# Altium PCB NEXUS32.PcbDoc (part 3 of 3)
Units mil, origin at the board's own origin, x right, y up, seen from the top; angles counter-clockwise.
Board outline 6299 x 4724 mil, 4 copper layers (Top Layer, L2_GND, L3_PWR, Bottom Layer), stack 63.6 mil thick; 220 components, 128 nets, 690 pads, 369 vias.
Unrouted connection lines stored in the file: 1.
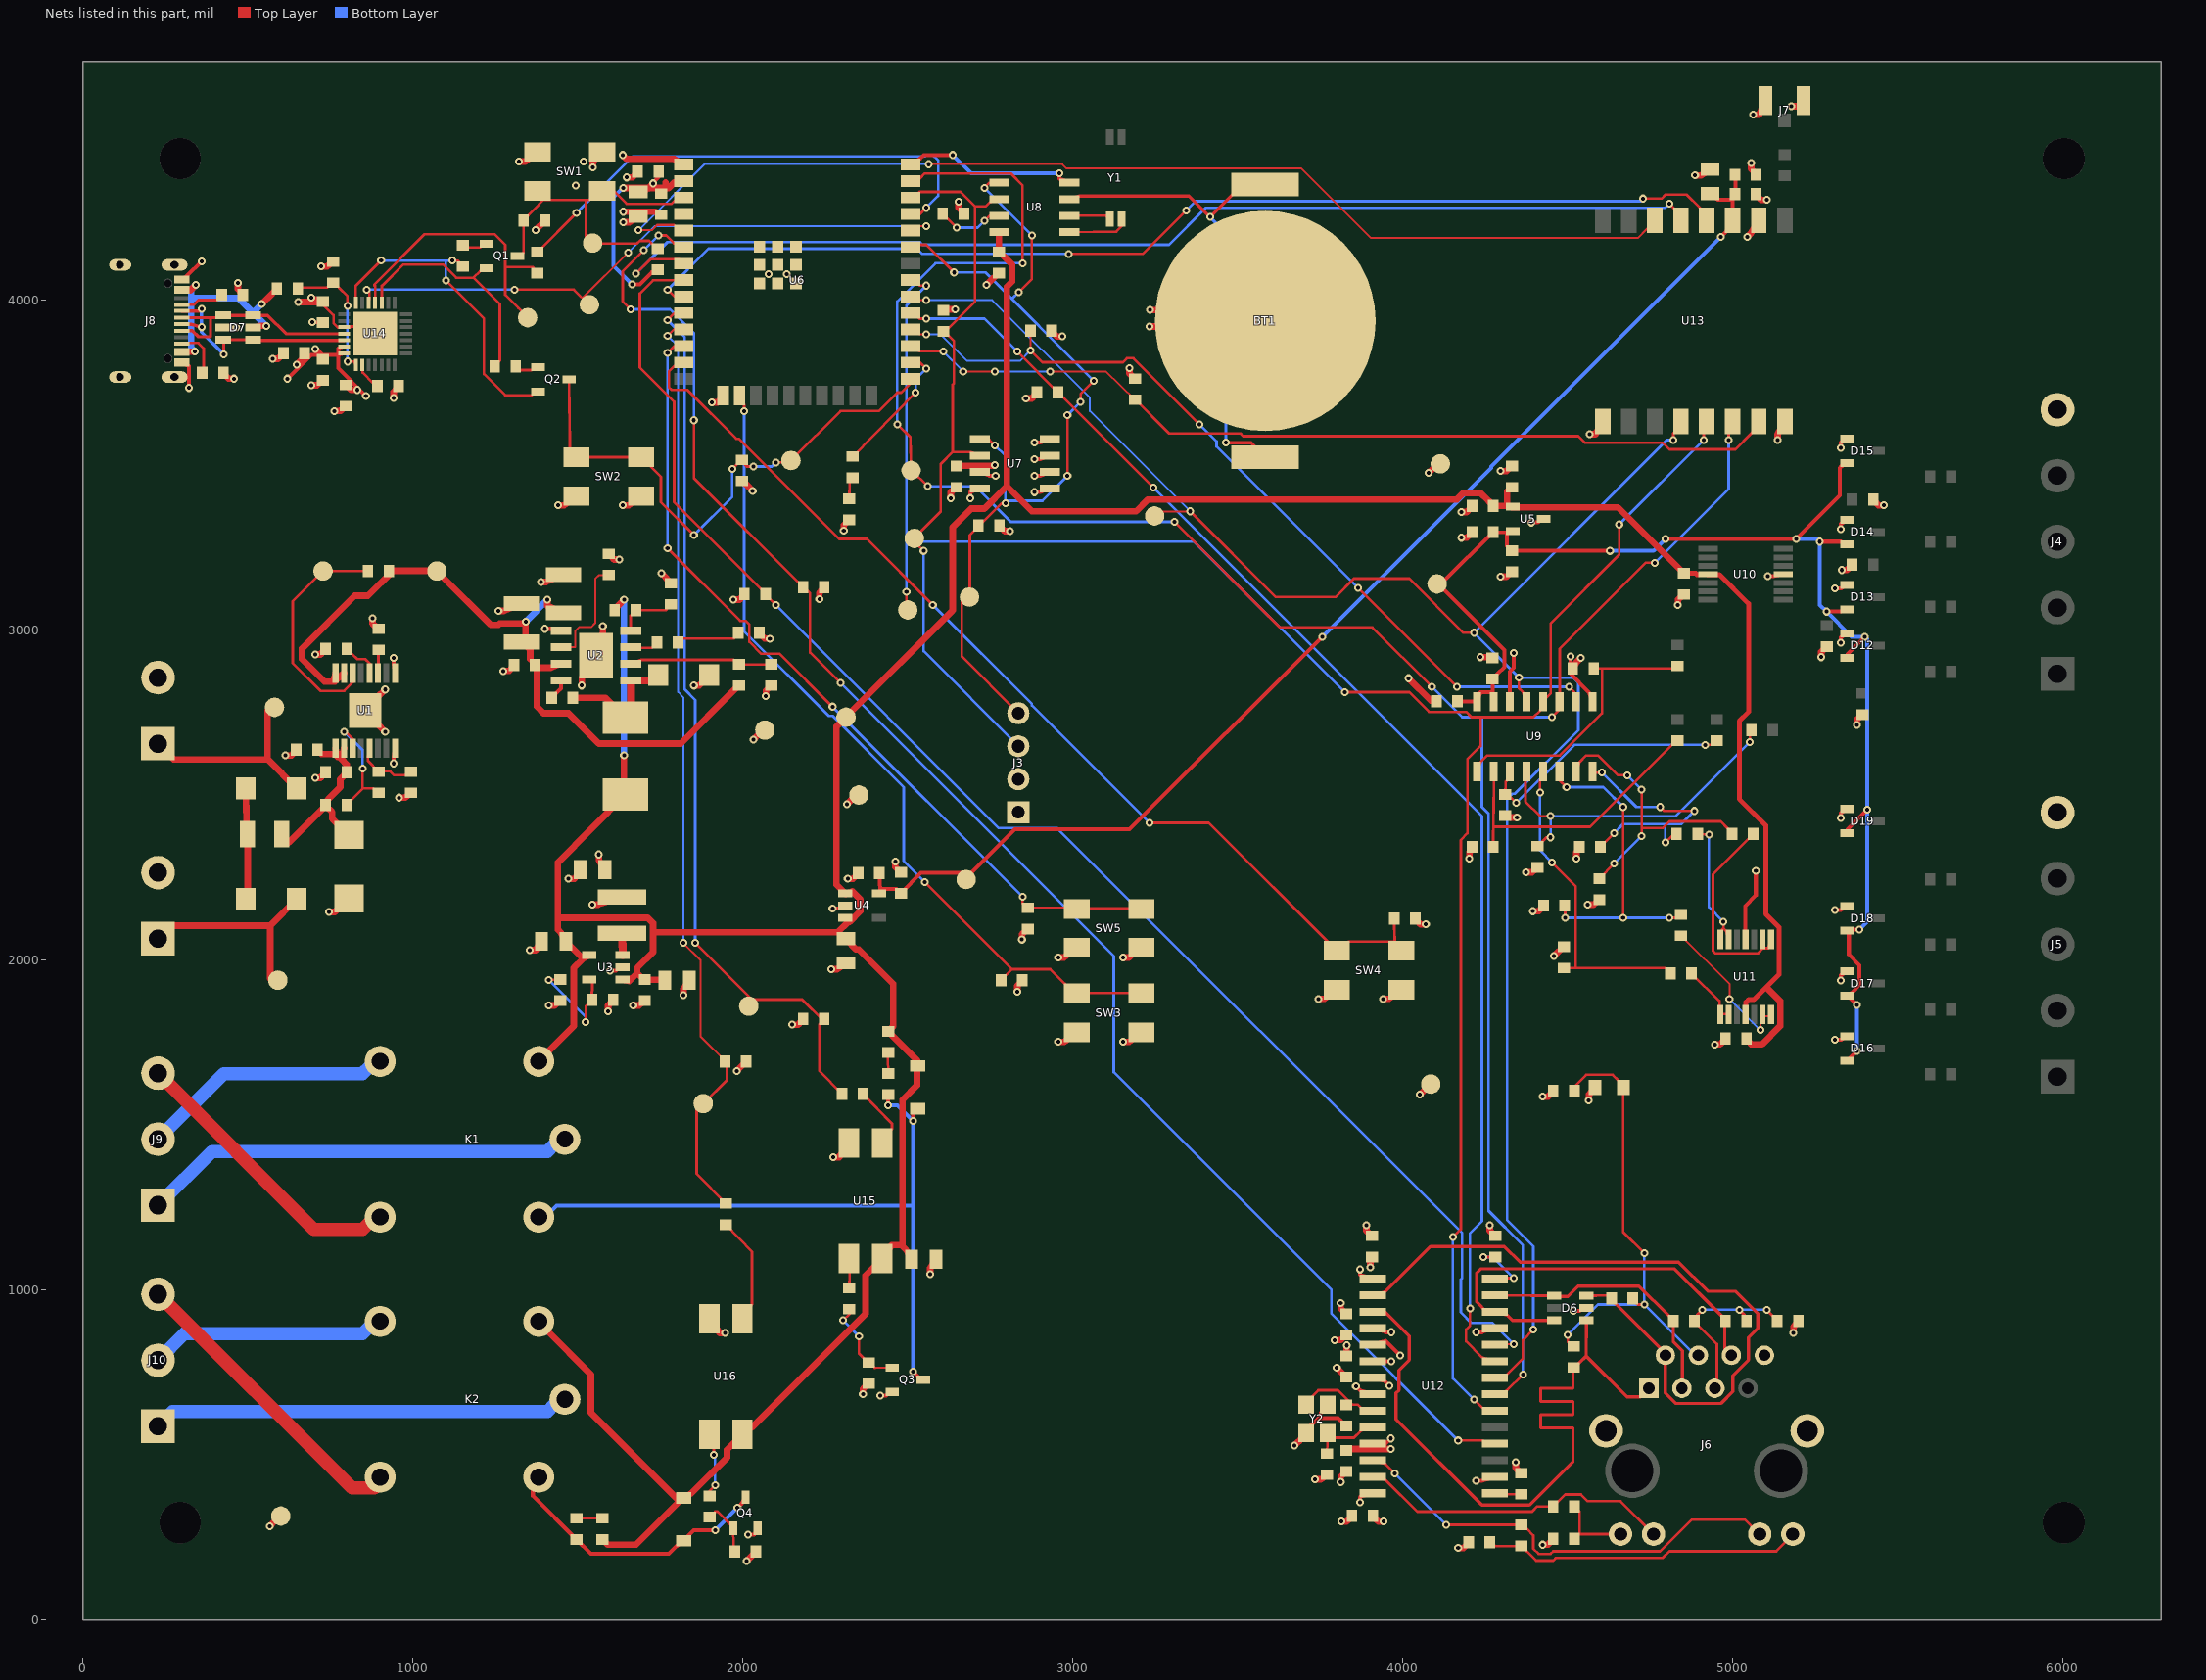
[diagram p4: the nets of this part, all layers, seen from the top]

## Via types
v1: diameter 24, hole 12, Top Layer to Bottom Layer, tented both sides, 369 vias

## Nets (pads, with @x,y where several pads share a name; then routed paths per layer and width w, separated by ;. In a path a pad name is that pad's centre, name@x,y a point inside that pad or via, vN(x,y) a via of type N, cw(c..) or ccw(c..) an arc to the next point about the centre after c; other vN are vias at no path point) (continued)
AOUT4: R38.1 U11.1 U11.2 | length 183.9
  Top Layer w8: R38.1@4875,1959 4960,1876 4960,1864 U11.1@4962,1835 ; U11.1@4964,1836 4980,1836 U11.2@4988,1835
AOUT5: R40.1 U11.6 U11.7 | length 461.2
  Top Layer w6: R40.1@4843,2074 4990,1928 v1(4990,1882) ; v1(5084,1788) 5084,1806 U11.6@5090,1835 ; U11.6@5090,1830 5108,1830 U11.7@5116,1835
  Bottom Layer w6: v1(4990,1882) v1(5084,1788)
AOUT6: R42.1 U11.8 U11.9 | length 637.7
  Top Layer w8: R42.1@5062,2382 4940,2260 4940,2028 4948,2020 5076,2020 U11.9@5092,2036 ; U11.9@5090,2063 U11.9@5092,2036 ; U11.8@5116,2063 5108,2036 U11.9@5092,2036
AOUT7: R44.1 U11.13 U11.14 | length 409.1
  Top Layer w8: R44.1@4894,2382 v1(4928,2380) ; U11.14@4962,2063 4968,2092 4972,2096 ; v1(4972,2116) 4972,2096 ; U11.13@4988,2063 4980,2088 4972,2096
  Bottom Layer w8: v1(4928,2380) 4928,2160 v1(4972,2116)
BST_N: C7.1 U2.8 | length 64.6
  Top Layer w12: C7.1@1421,2795 1449,2823 U2.8@1449,2848
BTN_DOWN: C27.1 SW4.1 U6.13 | length 3125.5
  Top Layer w8: U6.13@1821,3811 1792,3800 1776,3784 1776,3736 1784,3728 1832,3728 1980,3580 1988,3580 2292,3276 2376,3276 v1(2576,3076) ; v1(3232,2416) 3412,2416 SW4.1@3800,2028 3836,2056 SW4.1@3976,2056 ; C27.1@3974,2126 SW4.1@3976,2056 ; SW4.1@3996,2028 SW4.1@3976,2056
  Bottom Layer w8: v1(2576,3076) 2876,2776 2876,2772 v1(3232,2416)
BTN_OK: C28.1 SW5.1 U6.12 | length 2578.8
  Top Layer w8: v1(1772,3248) 1992,3028 2008,3028 2020,3016 2020,2964 2056,2928 2112,2928 v1(2272,2768) ; v1(1772,3840) 1792,3860 U6.12@1821,3861 ; v1(2848,2192) 2848,2172 C28.1@2864,2158 2976,2160 SW5.1@3012,2155 ; SW5.1@3012,2156 3172,2156 SW5.1@3208,2155
  Bottom Layer w8: v1(1772,3248) v1(1772,3840) ; v1(2272,2768) v1(2848,2192)
BTN_UP: C26.1 SW3.1 U6.16 | length 2552.9
  Top Layer w8: U6.16@1990,3711 2004,3684 v1(2004,3664) ; v1(2552,2236) 2816,1972 ; C26.1@2783,1939 2816,1972 ; SW3.1@3012,1899 2976,1928 2932,1972 2816,1972 ; SW3.1@3012,1900 3172,1900 SW3.1@3208,1899
  Bottom Layer w8: v1(2004,3664) 2004,2996 2260,2740 2272,2740 2488,2524 2488,2300 v1(2552,2236)
CC1: J8.A5 R59.1 | length 133.7
  Top Layer w8: J8.A5@300,3986 336,3986 350,4000 406,4000 R59.1@421,4016
CC2: J8.B5 R60.1 | length 147.9
  Top Layer w8: J8.B5@300,3868 302,3870 350,3870 366,3854 366,3798 R60.1@362,3780
CH0: C33.1 R26.2 U9.1 | length 851.7
  Top Layer w8: U9.1@4225,2571 4236,2600 4256,2620 4476,2620 4604,2748 4604,2884 ; C33.1@4579,2884 4816,2884 R26.2@4833,2891
CH1: C34.1 R29.2 U9.2 | length 892.2
  Top Layer w8: C34.1@4274,2343 4276,2544 U9.2@4275,2571 ; 4276,2404 4568,2404 4816,2652 R29.2@4833,2665
CH2: C35.1 R32.2 U9.3 | length 802.1
  Top Layer w8: C35.1@4311,2502 4312,2540 4316,2544 U9.3@4325,2571 ; C35.1@4312,2508 v1(4344,2476) ; v1(4916,2652) 4936,2652 R32.2@4951,2665
  Bottom Layer w8: v1(4344,2476) 4520,2652 v1(4916,2652)
CH3: C36.1 R35.2 U9.4 | length 1034.1
  Top Layer w8: U9.4@4375,2571 4372,2544 4372,2480 4416,2436 v1(4448,2436) ; C36.1@4409,2345 4436,2372 v1(4448,2372) ; v1(5052,2660) 5052,2680 R35.2@5057,2697
  Bottom Layer w8: v1(4448,2372) v1(4448,2436) 4828,2436 v1(5052,2660)
CH4: C37.1 R38.2 U9.5 | length 971.9
  Top Layer w8: v1(4416,2508) 4416,2544 U9.5@4425,2571 ; v1(4452,2296) 4524,2224 4524,1976 ; C37.1@4488,1976 4796,1976 R38.2@4811,1959
  Bottom Layer w8: v1(4416,2508) 4416,2332 v1(4452,2296)
CH5: C38.1 R40.2 U9.6 | length 979.2
  Top Layer w8: U9.6@4475,2571 4476,2544 v1(4496,2524) ; C38.1@4491,2165 v1(4492,2128) ; v1(4668,2128) v1(4668,2464) ; v1(4808,2128) 4828,2128 R40.2@4843,2138
  Bottom Layer w8: v1(4492,2128) v1(4808,2128) ; v1(4496,2524) 4608,2524 v1(4668,2464)
CH6: C39.1 R42.2 U9.7 | length 891.5
  Top Layer w8: U9.7@4525,2571 4536,2600 4556,2620 4592,2620 4652,2560 v1(4680,2560) ; C39.1@4596,2247 v1(4640,2292) ; v1(4724,2376) v1(4724,2516) ; 4724,2400 4788,2400 4808,2420 4964,2420 4984,2400 R42.2@4998,2382
  Bottom Layer w8: v1(4640,2292) v1(4724,2376) ; v1(4680,2560) v1(4724,2516)
CH7: C40.1 R44.2 U9.8 | length 787.2
  Top Layer w8: U9.8@4575,2571 4584,2568 v1(4604,2568) ; C40.1@4599,2343 v1(4640,2384) ; v1(4780,2464) 4792,2452 v1(4884,2452) ; v1(4796,2356) 4816,2376 R44.2@4830,2382
  Bottom Layer w8: v1(4604,2568) 4708,2464 v1(4780,2464) ; v1(4640,2384) 4668,2412 4844,2412 v1(4884,2452) ; v1(4796,2356) 4796,2412
COIL1: D8.1 D10.2 K1.2 Q3.3 | length 2114.8
  Top Layer w12: v1(2440,1560) D10.2@2441,1592 ; v1(2516,752) 2528,740 Q3.3@2547,728 ; v1(2516,1512) 2516,1532 D8.1@2530,1549
  Bottom Layer w12: K1.2@1382,1221 1416,1236 1436,1256 2516,1256 ; v1(2440,1560) 2468,1560 v1(2516,1512) v1(2516,752)
COIL2: D9.1 D11.2 K2.2 Q4.3 | length 852.5
  Top Layer w12: K2.2@1382,433 1364,400 1364,376 D11.2@1496,244 1540,200 1776,200 1800,224 D9.1@1821,240 ; D9.1@1820,240 1852,272 v1(1916,272) ; v1(1984,340) 1996,352 Q4.3@2008,372
  Bottom Layer w12: v1(1916,272) v1(1984,340)
COMP_N: R9.1 U2.3 | length 86.4
  Top Layer w8: U2.3@1661,2948 1692,2946 1724,2946 R9.1@1740,2963
COMP_RC: C8.1 R9.2 | length 194.6
  Top Layer w8: R9.2@1804,2963 1818,2974 1972,2974 C8.1@1986,2992
CS_ADC: R20.2 U6.28 U9.10 | length 2598.1
  Top Layer w6: U6.28@2509,3911 2536,3896 v1(2556,3896) ; v1(2872,3848) R20.2@2872,3907
  Top Layer w8: v1(2872,3848) 2908,3812 3152,3812 3164,3824 3184,3824 v1(3384,3624) ; v1(3864,3128) v1(4164,2828) ; v1(4504,2828) 4520,2812 U9.10@4525,2783
  Bottom Layer w6: v1(2556,3896) 2600,3896 2680,3816 2840,3816 v1(2872,3848)
  Bottom Layer w8: v1(3384,3624) 3436,3572 3436,3556 v1(3864,3128) ; v1(4164,2828) v1(4504,2828)
CS_ENC: R19.2 U6.29 U12.9 | length 4080.4
  Top Layer w8: U6.29@2509,3961 2536,3944 v1(2556,3944) ; v1(2832,3844) R19.2@2955,3720 ; R19.2@2956,3720 v1(3244,3432) ; v1(4204,944) 4204,892 4192,880 4192,844 4240,796 U12.9@4279,784
  Bottom Layer w8: v1(2556,3944) 2732,3944 v1(2832,3844) ; v1(3244,3432) 4240,2436 4240,1208 4204,1172 v1(4204,944)
CS_LORA: R21.2 U6.27 U13.15 | length 2738.1
  Top Layer w6: U6.27@2509,3861 2536,3844 v1(2608,3844) ; v1(2668,3784) v1(2764,3784) ; v1(2932,3784) 3100,3784 R21.2@3189,3698
  Top Layer w8: R21.2@3188,3700 3292,3596 3508,3596 3516,3588 4532,3588 4552,3568 4788,3568 4808,3548 5008,3548 5056,3596 U13.15@5079,3632
  Bottom Layer w6: v1(2608,3844) v1(2668,3784) ; v1(2764,3784) v1(2932,3784)
DIO0: U6.7 U13.5 | length 3456.4
  Top Layer w8: v1(1676,4080) 1720,4124 1808,4124 U6.7@1821,4111 ; v1(4808,4292) 4820,4280 U13.5@4843,4242
  Bottom Layer w8: v1(1676,4080) 1772,4176 2536,4176 2544,4168 3292,4168 3404,4280 4796,4280 v1(4808,4292)
DIO1: U6.5 U13.6 | length 3426.8
  Top Layer w6: v1(1684,4212) 1724,4212 1740,4228 1792,4228 U6.5@1821,4211 ; v1(2564,4412) 2968,4412 2980,4400 3692,4400 3904,4188 4712,4188 U13.6@4764,4242
  Bottom Layer w6: v1(1684,4212) 1884,4412 v1(2564,4412)
DTR_N: Q2.2 R61.1 U14.28 | length 1001.9
  Top Layer w8: 827,4044 U14.28@827,3992 U14.28@828,3992 ; 828,4044 v1(904,4120) ; v1(1100,4060) 1216,3944 1216,3776 1280,3712 1360,3712 Q2.2@1380,3723 ; v1(1120,4120) 1136,4120 R61.1@1152,4102
  Bottom Layer w8: v1(904,4120) v1(1120,4120) ; v1(1100,4060) 1100,4120
DVDT_N: C1.1 U1.12 | length 117.4
  Top Layer w8: C1.1@800,2943 832,2912 856,2912 872,2896 U1.12@869,2870
EN: C23.1 Q1.3 R14.2 SW1.1 TP10.1 U6.3 | length 1046.6
  Top Layer w8: Q1.3@1317,4134 1336,4144 C23.1@1336,4240 ; C23.1@1336,4242 SW1.1@1396,4304 ; SW1.1@1378,4331 SW1.1@1396,4304 ; 1524,4304 1524,4180 TP10.1@1545,4173 ; TP10.1@1544,4172 1680,4172 1688,4180 1716,4180 1724,4172 R14.2@1742,4156 ; SW1.1@1574,4331 1536,4304 SW1.1@1396,4304 ; SW1.1@1576,4332 1608,4332 1648,4292 1784,4292 1792,4300 U6.3@1821,4311
EN_N: R6.2 R7.1 U2.2 | length 433.5
  Top Layer w8: U2.2@1661,2898 1692,2910 1972,2910 R6.2@1988,2896 2072,2896 R7.1@2087,2896
FB3_N: R12.2 R13.1 U3.5 | length 351.2
  Top Layer w8: v1(1412,1940) 1432,1940 R13.1@1447,1941 ; v1(1524,1812) 1524,1860 R12.2@1544,1880 ; U3.5@1534,1941 1544,1932 R12.2@1543,1880
  Bottom Layer w8: v1(1412,1940) 1524,1828 v1(1524,1812)
FB5_N: R10.2 R11.1 U2.4 | length 168.8
  Top Layer w8: U2.4@1661,2998 1660,3010 1660,3044 R10.2@1676,3061 ; R10.2@1690,3060 1766,3060 R11.1@1781,3078
FLT: R5.1 TP4.1 U1.14 | length 710.6
  Top Layer w8: TP4.1@728,3179 748,3180 R5.1@864,3179 ; TP4.1@728,3180 636,3088 636,2900 720,2816 792,2816 820,2844 U1.14@818,2870
FREQ_N: R8.1 U2.6 | length 342.9
  Top Layer w6: U2.6@1449,2948 1492,2948 1492,2997 1504,3009 1541,3009 1553,3021 1553,3155 1565,3167 R8.1@1594,3167
GATE1: Q3.1 R65.2 R66.1 | length 278.9
  Top Layer w8: v1(2304,908) 2324,928 R65.2@2323,942 ; v1(2352,860) 2352,808 R66.1@2380,780 ; R66.1@2382,780 2400,764 Q3.1@2453,765
  Bottom Layer w8: v1(2304,908) v1(2352,860)
GATE2: Q4.1 R70.2 R71.1 | length 170
  Top Layer w8: R70.2@1900,312 1916,328 1924,328 Q4.1@1972,280 ; Q4.1@1971,278 1972,224 R71.1@1976,207
GND: BT1.2 C1.2 C2.2 C3.2 C4.2 C5.2 C6.2 C8.2 C9.2 C10.2 C11.2 C12.2 C13.2 C14.2 C15.2 C16.2 C17.2 C18.2 C19.2 C20.2 C21.2 C22.2 C23.2 C24.2 C25.2 C26.2 C27.2 C28.2 C29.2 C30.2 C31.2 C32.2 C33.2 C34.2 C35.2 C36.2 C37.2 C38.2 C39.2 C40.2 C41.2 C42.2 C43.2 C44.2 C45.2 C46.2 C47.2 C48.2 C49.2 C50.2 C51.2 C52.2 C53.2 C54.2 C55.2 C56.2 C57.2 C58.2 D3.1 D4.1 D5.2 D6.2 D7.2 D12.1 D13.1 D14.1 D15.1 D16.1 D17.1 D18.1 D19.1 J1.2 J2.2 J3.1 J4.5 J5.5 J6.8 J6.SH J7.2 J8.A1B12 J8.B1A12 J8.S1 Q3.2 Q4.2 R3.2 R4.2 R7.2 R8.2 R11.2 R13.2 R28.2 R31.2 R34.2 R37.2 R46.2 R58.2 R59.2 R60.2 R64.2 R66.2 R69.2 R71.2 SW1.2 SW2.2 SW3.2 SW4.2 SW5.2 TP5.1 TP19.1 TP20.1 TP21.1 U1.8 U1.9 U1.17 U2.5 U2.9 U3.2 U4.2 U5.3 U6.1 U6.15 U6.38 U6.39 U7.1 U7.2 U7.3 U7.4 U7.7 U8.4 U9.9 U9.14 U10.11 U11.11 U12.2 U12.11 U12.18 U12.21 U12.22 U13.2 U13.9 U13.16 U14.3 U14.29 U15.2 U16.2 Y2.2 Y2.4 | length 8672.2
  Top Layer w8: v1(692,4008) 706,4008 760,3954 760,3930 774,3916 U14.3@792,3918 808,3916 812,3920 860,3920 U14.29@886,3898
  Top Layer w12: J8.B1A12@300,3811 322,3800 v1(322,3734) ; J8.A1B12@300,4063 316,4074 v1(360,4118) ; D7.2@426,3917 v1(465,3917) ; v1(942,2596) 942,2614 U1.8@946,2642 ; v1(942,2916) 942,2898 U1.9@946,2870 ; v1(1400,3004) 1418,3004 U2.5@1449,2998 ; v1(1598,1968) 1616,1968 U3.2@1636,1978 ; v1(2016,258) 2034,258 Q4.2@2045,278 ; v1(2272,2156) 2290,2156 U4.2@2311,2165 ; v1(2416,680) 2434,680 Q3.2@2453,691 ; U6.38@2509,4411 2536,4428 2548,4440 v1(2636,4440) ; U7.7@2719,3479 2748,3468 v1(2766,3468) ; v1(2884,3418) 2902,3418 U7.1@2931,3429 ; v1(2884,3468) 2902,3468 U7.2@2931,3479 ; v1(2884,3518) 2902,3518 U7.3@2931,3529 ; v1(2884,3568) 2902,3568 U7.4@2931,3579 ; v1(2960,4384) 2960,4368 U8.4@2990,4356 ; Y2.2@3708,568 3708,576 3744,612 3804,612 3812,604 C49.2@3829,588 ; 3752,612 3752,628 Y2.4@3773,653 ; v1(3858,708) 3870,696 U12.22@3909,684 ; U12.21@3909,734 3948,722 v1(3960,710) ; U12.18@3909,884 3948,872 v1(3966,872) ; v1(4222,422) 4240,422 U12.2@4279,434 ; v1(4222,872) 4240,872 U12.11@4279,884 ; U9.14@4325,2783 4324,2812 4324,2874 4336,2886 v1(4336,2930) ; v1(4390,3326) 4408,3326 U5.3@4427,3337 ; v1(4508,2920) 4508,2868 4564,2812 U9.9@4575,2783 ; v1(4518,936) 4536,936 D6.2@4557,945 ; U11.11@5039,2063 5038,2092 5038,2164 5070,2196 v1(5070,2270) ; v1(5106,3164) 5124,3164 U10.11@5153,3169 ; v1(5310,1758) 5328,1758 D16.1@5347,1769 ; v1(5310,2152) 5328,2152 D18.1@5347,2163 ; v1(5310,3126) 5328,3126 D13.1@5347,3137 ; v1(5328,1938) 5328,1954 D17.1@5347,1966 ; v1(5328,2430) 5328,2446 D19.1@5347,2458 ; v1(5328,2962) 5328,2978 D12.1@5347,2990 ; v1(5328,3306) 5328,3322 D14.1@5347,3334 ; v1(5328,3552) 5328,3568 D15.1@5347,3580
  Top Layer w20: R60.2@426,3780 442,3762 v1(458,3762) ; v1(470,4052) 470,4034 R59.2@485,4016 ; v1(566,284) 582,300 TP21.1@600,315 ; v1(576,3822) 592,3822 C56.2@608,3839 ; v1(614,2620) 632,2620 C3.2@647,2638 ; v1(652,3994) 710,3994 C57.2@728,3996 ; v1(692,3742) 710,3742 C55.2@728,3757 ; v1(704,2552) 720,2552 C2.2@736,2569 ; v1(704,2926) 720,2926 C1.2@736,2943 ; v1(722,4102) 740,4102 R58.2@758,4117 ; v1(746,2146) 764,2146 D3.1@807,2187 ; v1(762,3664) 780,3664 C54.2@797,3679 ; v1(878,3036) 878,3020 R4.2@896,3004 ; v1(916,2692) 904,2704 U1.17@856,2756 904,2808 v1(916,2820) ; v1(958,2492) 976,2492 R3.2@994,2507 ; v1(1260,3058) 1276,3058 C5.2@1329,3080 ; v1(1274,2876) 1292,2876 C6.2@1307,2894 ; v1(1322,4420) 1340,4420 SW1.2@1378,4449 ; v1(1354,2030) 1372,2030 C11.2@1390,2057 ; v1(1372,4212) 1384,4224 C23.2@1400,4242 ; v1(1388,3146) 1404,3146 C4.2@1457,3168 ; v1(1412,1862) 1430,1862 R13.2@1447,1877 ; v1(1440,3378) 1458,3378 SW2.2@1496,3406 ; v1(1472,2246) 1490,2246 C13.2@1508,2274 ; v1(1512,2832) 1512,2854 U2.9@1555,2923 1576,2992 v1(1576,3012) ; v1(1546,4402) 1546,4420 SW1.2@1574,4449 ; R8.2@1594,3231 1610,3214 v1(1626,3214) ; v1(1636,3378) 1654,3378 SW2.2@1692,3406 ; v1(1636,4440) 1648,4428 1792,4428 U6.1@1821,4411 ; v1(1638,4236) 1656,4236 C20.2@1683,4254 ; v1(1638,4268) 1734,4268 C21.2@1752,4259 ; v1(1648,4372) 1666,4372 C22.2@1681,4390 ; v1(1668,1862) 1686,1862 C12.2@1703,1877 ; v1(1754,3172) 1766,3160 R11.2@1781,3142 ; v1(1820,1894) 1820,1912 C9.2@1838,1939 ; v1(1852,2832) 1868,2832 D4.1@1898,2864 ; U16.2@1899,913 1930,870 v1(1946,870) ; v1(1906,3690) 1924,3690 U6.15@1940,3711 ; v1(1982,1664) 1994,1676 R69.2@2010,1693 ; v1(2012,178) 2024,190 R71.2@2040,207 ; C8.2@2050,2992 2066,2974 v1(2082,2974) ; v1(2070,2800) 2070,2816 R7.2@2087,2832 ; v1(2150,1804) 2168,1804 R64.2@2183,1821 ; v1(2268,1972) 2286,1972 C10.2@2313,1991 ; v1(2274,1402) 2292,1402 U15.2@2322,1445 ; v1(2306,3302) 2306,3318 D5.2@2323,3334 ; v1(2316,2472) 2332,2488 TP5.1@2352,2500 ; v1(2318,2246) 2334,2246 C15.2@2350,2264 ; v1(2364,684) 2364,700 R66.2@2382,716 ; v1(2462,2298) 2462,2282 C16.2@2480,2266 ; v1(2568,1048) 2568,1066 C58.2@2586,1093 ; C24.2@2648,3497 2666,3498 2762,3498 v1(2764,3500) ; v1(2738,4046) 2758,4066 C25.2@2776,4082 ; v1(2832,1904) 2832,1922 C26.2@2847,1939 ; v1(2846,2062) 2846,2078 C28.2@2864,2094 ; v1(2956,1752) 2974,1752 SW3.2@3012,1781 ; v1(2956,2008) 2974,2008 SW5.2@3012,2037 ; v1(3152,1752) 3170,1752 SW3.2@3208,1781 ; v1(3152,2008) 3170,2008 SW5.2@3208,2037 ; v1(3232,3920) BT1.2@3316,3920 ; v1(3234,3970) BT1.2@3318,3970 ; v1(3672,528) 3684,540 Y2.2@3707,567 ; v1(3734,426) 3752,426 C50.2@3770,440 ; v1(3744,1882) 3762,1882 SW4.2@3800,1910 ; v1(3800,764) 3812,752 C43.2@3829,736 ; v1(3812,418) 3812,434 C46.2@3829,450 ; v1(3812,960) 3812,944 C42.2@3829,928 ; v1(3814,298) 3830,298 C45.2@3846,315 ; v1(3890,1196) 3890,1180 C44.2@3907,1164 ; v1(3940,1882) 3958,1882 SW4.2@3996,1910 ; v1(4018,2854) 4086,2786 C29.2@4102,2785 ; C27.2@4038,2126 4054,2108 v1(4070,2108) ; v1(4052,1592) 4068,1608 TP19.1@4085,1624 ; v1(4078,3476) 4094,3492 TP20.1@4114,3504 ; v1(4178,3280) 4194,3280 C18.2@4210,3297 ; v1(4178,3358) 4194,3358 C14.2@4210,3376 ; v1(4202,2308) 4202,2326 C34.2@4210,2343 ; v1(4236,2918) 4254,2918 C30.2@4272,2916 ; v1(4264,1196) 4264,1180 R46.2@4281,1164 ; v1(4296,3162) 4314,3162 C19.2@4331,3177 ; v1(4296,3482) 4314,3482 C17.2@4331,3497 ; C35.2@4311,2438 4328,2432 v1(4346,2432) ; v1(4342,478) 4342,460 C41.2@4360,445 ; v1(4374,2266) 4392,2266 C36.2@4409,2281 ; v1(4394,2148) 4412,2148 C38.2@4427,2165 ; v1(4424,1586) 4440,1586 C47.2@4456,1604 ; v1(4458,2012) 4470,2024 C37.2@4488,2040 ; C33.2@4515,2884 4526,2902 v1(4540,2916) ; v1(4526,2308) 4526,2326 C40.2@4535,2343 ; v1(4560,2168) 4578,2168 C39.2@4596,2183 ; v1(4566,3594) 4584,3594 U13.9@4606,3632 ; v1(4834,3076) 4834,3092 C32.2@4852,3108 ; v1(4886,4378) 4904,4378 C52.2@4931,4397 ; v1(4946,1744) 4962,1744 C31.2@4978,1762 ; v1(5044,4192) 5056,4204 U13.2@5079,4242 ; v1(5056,4416) 5056,4398 C51.2@5071,4380 ; v1(5062,4562) 5080,4562 J7.2@5099,4605 ; C53.2@5071,4321 5086,4304 v1(5104,4304) ; v1(5136,3576) 5136,3594 U13.16@5158,3632 ; v1(5178,4588) 5196,4588 J7.2@5215,4605 ; v1(5184,870) 5184,888 C48.2@5199,906 ; v1(5268,2918) 5268,2934 R31.2@5285,2950 ; v1(5330,3182) 5346,3182 R34.2@5362,3199 ; v1(5376,2712) 5376,2728 R28.2@5394,2744 ; R37.2@5426,3396 5442,3378 v1(5458,3378)
  Bottom Layer w12: v1(2636,4440) 2692,4384 v1(2960,4384)
  other v1: 2078,4079 2133,4079 1518,4420
ILIM_N: R4.1 U1.11 | length 70.1
  Top Layer w8: U1.11@894,2870 896,2896 R4.1@896,2940
INT_ENC: R23.2 U6.6 U12.4 | length 5018.9
  Top Layer w8: v1(1660,3972) 1636,3996 1636,4088 v1(1700,4152) ; v1(1744,4196) 1768,4196 1792,4172 U6.6@1821,4161 ; v1(1852,3636) 1852,3460 R23.2@2183,3130 ; R23.2@2184,3132 2204,3112 2204,2932 v1(2296,2840) ; v1(4168,544) 4240,544 U12.4@4279,534
  Bottom Layer w8: v1(1660,3972) 1780,3972 1852,3900 v1(1852,3636) ; v1(1700,4152) v1(1744,4196) ; v1(2296,2840) 3124,2012 3124,1660 3784,1000 3784,928 v1(4168,544)
IO0: Q2.3 R15.2 SW2.1 TP11.1 U6.25 | length 1660.4
  Top Layer w8: Q2.3@1474,3760 1476,3552 SW2.1@1496,3524 1656,3524 SW2.1@1692,3524 1752,3464 1752,3388 v1(1852,3288) ; v1(1968,3488) 1980,3500 R15.2@1998,3516 ; R15.2@1996,3512 2012,3496 v1(2032,3496) ; v1(2100,3508) 2124,3508 TP11.1@2146,3514 ; TP11.1@2148,3516 2296,3664 2412,3664 2468,3720 2480,3720 2504,3744 U6.25@2509,3761
  Bottom Layer w8: v1(1852,3288) 1968,3404 v1(1968,3488) ; v1(2032,3496) 2088,3496 v1(2100,3508)
K1_COM: J9.1 K1.3 | length 1312.6
  Bottom Layer w40: J9.1@228,1257 392,1420 1408,1420 1428,1440 K1.3@1461,1457
K1_NC: J9.3 K1.4 | length 881.6
  Top Layer w40: J9.3@228,1657 700,1184 848,1184 868,1204 K1.4@901,1221
K1_NO: J9.2 K1.5 | length 767.5
  Bottom Layer w40: J9.2@228,1457 428,1656 848,1656 868,1676 K1.5@901,1693
K2_COM: J10.1 K2.3 | length 1264.3
  Bottom Layer w40: J10.1@228,587 272,632 1408,632 1428,652 K2.3@1461,669
K2_NC: J10.3 K2.4 | length 936
  Top Layer w40: J10.3@228,987 816,400 884,400 K2.4@901,433
K2_NO: J10.2 K2.5 | length 719.3
  Bottom Layer w40: J10.2@228,787 308,868 848,868 868,888 K2.5@901,905
LED1_A: D10.1 R67.2 | length 64
  Top Layer w8: D10.1@2441,1656 2440,1704 R67.2@2441,1720
LED2_A: D11.1 R72.2 | length 79
  Top Layer w8: D11.1@1496,308 1560,308 R72.2@1575,308
LED_A: D5.1 R24.2 | length 66.7
  Top Layer w8: D5.1@2323,3398 2324,3448 R24.2@2333,3462
LED_USER: R24.1 U6.26 | length 412.8
  Top Layer w8: R24.1@2333,3526 v1(2524,3720) ; U6.26@2509,3811 2536,3812 v1(2556,3792)
  Bottom Layer w8: v1(2524,3720) 2524,3760 v1(2556,3792)
LEDA_A: J6.9 R51.2 R53.1 | length 235.9
  Top Layer w8: R51.2@4520,246 4536,260 ; R53.1@4520,344 4536,328 4536,260 ; J6.9@4660,260 4536,260
LEDA_N: J6.10 R53.2 U12.27 | length 963.3
  Top Layer w8: U12.27@3909,434 3948,424 4044,328 4392,328 4408,344 R53.2@4456,344 4472,360 4492,380 4540,380 4560,360 4660,360 J6.10@4760,260
LEDB_A: J6.12 R52.2 R54.1 | length 974
  Top Layer w8: R52.2@4264,236 4280,224 R54.1@4360,224 4376,208 4404,180 4456,180 4464,188 4788,188 4808,208 5132,208 J6.12@5182,260
LEDB_N: J6.11 R54.2 U12.26 | length 1370.7
  Top Layer w8: U12.26@3909,484 3948,472 v1(3976,444) ; v1(4132,288) R54.2@4360,288 4376,276 4396,256 4396,216 4412,200 4448,200 4456,208 4780,208 4876,304 5036,304 J6.11@5082,260
  Bottom Layer w8: v1(3976,444) v1(4132,288)
MISO: TP17.1 U6.31 U9.12 U12.6 U13.13 | length 6493.6
  Top Layer w8: v1(2496,3116) 2496,3064 TP17.1@2500,3061 ; U6.31@2509,4061 2536,4044 v1(2556,4044) ; v1(3824,2812) 4020,2812 4080,2752 4192,2752 4208,2736 4396,2736 4416,2756 U9.12@4425,2783 ; v1(4152,1160) 4176,1184 4176,2364 4196,2384 4196,2608 4236,2648 4236,2736 ; v1(4216,668) 4240,644 U12.6@4279,634 ; U9.12@4424,2784 4448,2808 4448,3020 4656,3228 v1(4656,3320) ; v1(4912,3576) 4912,3596 U13.13@4921,3632
  Bottom Layer w8: v1(2496,3116) 2496,3984 v1(2556,4044) ; 2496,3268 3368,3268 v1(3824,2812) ; v1(4152,1160) 4152,732 v1(4216,668) ; v1(4656,3320) v1(4912,3576)
MOSI: TP18.1 U6.37 U9.11 U12.7 U13.14 | length 7087.9
  Top Layer w8: v1(2468,3624) 2508,3584 TP18.1@2510,3484 ; U6.37@2509,4361 2536,4368 2552,4384 2812,4384 2848,4348 v1(2848,4112) ; TP18.1@2512,3484 v1(2560,3436) ; v1(3308,3328) 3628,3008 3908,3008 v1(4088,2828) ; U12.7@4279,684 4316,696 v1(4364,744) ; v1(4452,2736) 4472,2756 U9.11@4475,2783 ; U9.11@4476,2784 4476,2944 4736,3204 v1(4764,3204) ; v1(4988,3576) 4988,3596 U13.14@5000,3632
  Bottom Layer w8: v1(2468,3624) 2468,3996 2584,4112 v1(2848,4112) ; v1(2560,3436) 2704,3436 2812,3328 v1(3308,3328) ; v1(4088,2828) 4180,2736 v1(4452,2736) ; 4240,2736 4240,2464 4260,2444 4260,1240 4364,1136 v1(4364,744) ; v1(4764,3204) 4988,3428 v1(4988,3576)
OPT1_A: R63.2 U15.1 | length 193.6
  Top Layer w8: R63.2@2365,1594 2452,1504 2452,1488 U15.1@2422,1445
OPT1_E: R65.1 U15.3 | length 89.1
  Top Layer w8: U15.3@2322,1095 2324,1052 R65.1@2323,1006
OPT2_A: R68.2 U16.1 | length 325.7
  Top Layer w8: R68.2@1949,1198 2028,1116 2028,956 U16.1@1999,913
OPT2_E: R70.1 U16.3 | length 197.2
  Top Layer w8: U16.3@1899,563 1912,520 v1(1912,500) ; R70.1@1900,376 1900,392 v1(1916,408)
  Bottom Layer w8: v1(1912,500) 1916,496 v1(1916,408)
OSC1_N: C49.1 U12.23 Y2.1 | length 263.7
  Top Layer w8: Y2.1@3707,653 3728,680 3744,696 3804,696 3848,652 ; C49.1@3829,652 3864,652 3872,644 U12.23@3909,634
OSC2_N: C50.1 U12.24 Y2.3 | length 210.3
  Top Layer w8: C50.1@3770,504 3772,540 Y2.3@3773,567 ; Y2.3@3772,552 3852,552 3872,572 U12.24@3909,584
OVP_N: R2.2 R3.1 U1.5 | length 190.5
  Top Layer w8: U1.5@869,2642 864,2616 864,2604 R2.2@896,2571 ; R2.2@896,2572 932,2572 944,2560 976,2560 R3.1@994,2571
Q1_B: Q1.1 R61.2 | length 75
  Top Layer w8: R61.2@1152,4166 1168,4160 1204,4160 Q1.1@1223,4171
Q2_B: Q2.1 R62.2 | length 74.2
  Top Layer w8: R62.2@1312,3799 1324,3788 1360,3788 Q2.1@1380,3797
RBIAS_N: R46.1 U12.14 | length 212.6
  Top Layer w8: v1(4244,1100) R46.1@4281,1100 ; U12.14@4279,1034 4316,1036 v1(4336,1036)
  Bottom Layer w8: v1(4244,1100) 4272,1100 v1(4336,1036)
RLY1: R63.1 R64.1 TP22.1 U6.10 | length 2749.2
  Top Layer w8: v1(1772,3940) 1792,3960 U6.10@1821,3961 ; v1(1856,2052) TP22.1@2028,1880 ; TP22.1@2018,1860 TP22.1@2028,1880 ; R64.1@2244,1816 2180,1880 TP22.1@2028,1880 ; R64.1@2247,1821 2232,1804 2232,1664 R63.1@2301,1594
  Bottom Layer w8: v1(1772,3940) 1824,3888 1824,2820 1856,2788 v1(1856,2052)
RLY2: R68.1 R69.1 TP23.1 U6.11 | length 2842.6
  Top Layer w6: v1(1772,3892) 1792,3912 U6.11@1821,3911 ; v1(1820,2052) 1872,2000 1872,1768 R69.1@1948,1692
  Top Layer w8: TP23.1@1880,1564 1952,1636 1952,1676 R69.1@1946,1693 ; TP23.1@1880,1565 1860,1556 1860,1352 R68.1@1949,1262
  Bottom Layer w6: v1(1772,3892) 1804,3860 1804,2812 1820,2796 v1(1820,2052)
RST_ENC: R22.2 U6.8 U12.10 | length 4630.3
  Top Layer w8: U6.8@1821,4061 1792,4060 1728,4060 1688,4020 1688,3796 1792,3692 1792,3388 R22.2@2069,3110 2084,3092 v1(2100,3076) ; U12.10@4279,834 v1(4336,836)
  Bottom Layer w8: v1(2100,3076) 2776,2400 2952,2400 4180,1172 4180,1036 4176,1032 4176,932 4208,900 4272,900 v1(4336,836)
RST_LORA: U6.9 U13.4 | length 3377.8
  Top Layer w8: v1(1772,4032) 1792,4012 U6.9@1821,4011 ; v1(2988,4140) 3212,4140 v1(3344,4272) ; v1(4728,4308) 4784,4308 4796,4320 4860,4320 4900,4280 U13.4@4921,4242
  Bottom Layer w8: v1(1772,4032) 1896,4156 2528,4156 2544,4140 v1(2988,4140) ; v1(3344,4272) 3372,4300 4720,4300 v1(4728,4308)
RSTB: R56.2 U14.9 | length 84.6
  Top Layer w8: U14.9@847,3804 848,3788 848,3780 880,3748 R56.2@893,3740
RTS_N: Q1.2 R62.1 U14.24 | length 730.9
  Top Layer w8: 906,4044 U14.24@906,3992 U14.24@908,3992 ; 908,4044 972,4108 1092,4108 1132,4068 1184,4068 ; Q1.2@1223,4097 1204,4088 1184,4068 ; R62.1@1248,3799 1264,3816 1264,3988 1184,4068
RX_CT: C48.1 J6.5 R49.2 R50.1 | length 556.9
  Top Layer w8: R49.2@4884,904 4952,836 4952,724 J6.5@4946,702 ; R49.2@4884,906 4892,924 v1(4908,940) ; v1(5020,940) 5036,924 R50.1@5042,906 ; v1(5104,940) C48.1@5135,906
  Bottom Layer w8: v1(4908,940) v1(5020,940) v1(5104,940)
RXD0: TP13.1 U6.34 U14.26 | length 1916.6
  Top Layer w6: TP13.1@1516,4008 v1(1652,4144) ; U6.34@2509,4211 2536,4224 v1(2556,4224)
  Top Layer w8: v1(860,4032) 868,4024 868,4008 U14.26@866,3992 ; v1(1308,4032) 1488,4032 TP13.1@1535,3986
  Bottom Layer w6: v1(1652,4144) 1732,4224 v1(2556,4224)
  Bottom Layer w8: v1(860,4032) v1(1308,4032)
SCK: TP16.1 U6.30 U9.13 U12.8 U13.12 | length 5972.1
  Top Layer w6: U6.30@2509,4011 2536,4000 v1(2556,4000) ; TP16.1@3248,3346 3264,3360 v1(3356,3360)
  Top Layer w8: v1(3356,3360) 3616,3100 3796,3100 3852,3156 4020,3156 4184,2992 v1(4216,2992) ; U12.8@4279,734 4316,744 4364,792 4364,848 v1(4396,880) ; v1(4352,2856) 4352,2824 4364,2812 U9.13@4375,2783 ; v1(4820,3576) 4820,3596 U13.12@4843,3632
  Bottom Layer w6: v1(2556,4000) 2756,4000 3052,3704 3052,3664 v1(3356,3360)
  Bottom Layer w8: v1(4396,880) 4396,1132 4316,1212 4316,2488 4332,2504 4340,2504 4532,2696 4532,2840 4516,2856 v1(4352,2856) v1(4216,2992) 4800,3576 v1(4820,3576)
SCL: J3.3 R18.2 TP15.1 U6.36 U7.6 U8.6 | length 2249.5
  Top Layer w8: U6.36@2509,4311 2536,4328 2660,4328 2704,4284 ; TP15.1@2520,3278 2528,3260 v1(2548,3240) ; TP15.1@2520,3280 2600,3360 2600,3504 2636,3540 ; R18.2@2608,3905 2624,3892 2640,3876 2640,3748 2636,3744 2636,3540 ; R18.2@2612,3904 2704,3996 2704,4284 ; U7.6@2719,3529 2692,3540 2636,3540 ; U8.6@2778,4306 2748,4296 2736,4284 2704,4284
  Bottom Layer w8: v1(2548,3240) 2548,2936 J3.3@2835,2648
SDA: J3.4 R17.2 TP14.1 U6.33 U7.5 U8.5 | length 2758.4
  Top Layer w8: U6.33@2509,4161 2536,4168 2556,4168 v1(2640,4084) ; TP14.1@2687,3100 2664,3096 2664,2920 J3.4@2835,2748 ; TP14.1@2688,3100 2688,3288 2700,3300 R17.2@2714,3317 ; R17.2@2716,3316 2784,3384 v1(2796,3384) ; U7.5@2719,3579 2748,3576 v1(2764,3560) ; v1(2732,4340) 2748,4356 U8.5@2778,4356 ; v1(2836,4024) 2876,4064 v1(2876,4196) ; v1(2984,3468) v1(2984,3652) ; v1(3024,3692) 3024,3716 v1(3064,3756)
  Bottom Layer w8: v1(2640,4084) 2736,4084 v1(3064,3756) ; v1(2732,4340) v1(2876,4196) ; v1(2764,3560) 2796,3528 v1(2796,3384) ; v1@2796,3392 2908,3392 v1(2984,3468) ; 2816,4004 v1(2836,4024) ; v1(2984,3652) v1(3024,3692)
SQW: R25.2 U6.4 U8.7 | length 204.3
  Top Layer w8: R25.2@2606,4262 v1(2648,4220) ; v1(2732,4240) 2748,4256 U8.7@2778,4256
  Bottom Layer w8: v1(2648,4220) 2712,4220 v1(2732,4240)
SW3_N: L2.1 U3.3 | length 66
  Top Layer w24: L2.1@1634,2081 1636,2024 U3.3@1636,2015
SW5_N: C7.2 D4.2 L1.1 U2.1 | length 394.9
  Top Layer w20: C7.2@1485,2795 1583,2795 L1.1@1644,2734
  Top Layer w24: L1.1@1644,2734 1661,2751 U2.1@1661,2848 1728,2848 D4.2@1744,2864
TPIN_N: D6.6 J6.6 R50.2 U12.12 | length 1289.3
  Top Layer w10: U12.12@4279,934 4316,924 4332,908 D6.6@4459,908 ; U12.12@4280,932 4256,932 4224,964 4224,1052 4236,1064 4824,1064 4964,924 R50.2@4978,906 ; R50.2@4976,908 4976,812 J6.6@4996,802
TPIN_P: D6.4 J6.3 R49.1 U12.13 | length 811.5
  Top Layer w10: U12.13@4279,984 4316,984 D6.4@4459,982 ; D6.4@4460,980 4500,980 4532,1012 4716,1012 4804,924 R49.1@4820,906 ; R49.1@4820,904 4820,844 4848,816 4848,724 J6.3@4846,702
TPOUT_N: D6.3 J6.2 R48.2 U12.16 | length 2241.3
  Top Layer w10: U12.16@3909,984 3948,996 4084,1132 4308,1132 4356,1084 4836,1084 4924,996 5008,996 5076,928 5076,884 5048,856 5048,788 5000,740 5000,692 4964,656 4828,656 4796,688 J6.2@4796,804 ; D6.3@4557,982 4620,984 R48.2@4633,974 ; R48.2@4632,972 4784,820 J6.2@4796,802
TPOUT_P: D6.1 J6.1 R47.1 U12.17 | length 2195.7
  Top Layer w10: U12.17@3909,934 3948,932 4020,860 4020,788 3988,756 3988,696 3980,688 3980,608 4240,348 4384,348 4516,480 4516,542 4516,582 4418,582 4418,622 4516,622 4516,662 4418,662 4418,702 4516,702 R47.1@4516,764 ; R47.1@4518,765 4536,780 4556,800 ; D6.1@4557,908 4556,800 ; J6.1@4746,702 4720,676 4680,676 4556,800
TX_CT: C47.1 FB1.2 J6.4 R47.2 R48.1 | length 1462.8
  Top Layer w8: v1(4500,864) 4500,844 R47.2@4518,829 ; C47.1@4520,1604 4520,1616 4556,1652 4636,1652 4652,1636 FB1.2@4669,1614 ; FB1.2@4668,1616 4668,1176 v1(4732,1112) ; R48.1@4697,974 4712,956 v1(4732,956)
  Bottom Layer w8: v1(4500,864) 4592,956 v1(4732,956) ; v1(4732,1112) v1(4732,956) ; J6.4@4896,802 4876,812 v1(4732,956)
TXD0: R16.2 TP12.1 U14.25 | length 885.9
  Top Layer w8: U14.25@884,3992 U14.25@886,3992 886,4044 ; 884,4044 884,4048 1036,4200 1248,4200 1280,4168 1280,4016 1320,3976 TP12.1@1348,3947 ; 1280,4100 1364,4100 R16.2@1378,4082
TXD0_CHIP: R16.1 U6.35 | length 1556.6
  Top Layer w8: R16.1@1378,4146 v1(1496,4264) ; U6.35@2509,4261 2536,4260 v1(2556,4280)
  Bottom Layer w8: v1(1496,4264) 1668,4436 2552,4436 2556,4440 2576,4440 2592,4424 2592,4316 v1(2556,4280)
USB_DN: D7.3 D7.4 J8.A7 J8.B7 U14.5 | length 700.8
  Top Layer w10: J8.A7@300,3927 330,3927 v1(360,3918) ; J8.B7@300,3967 353,3967 v1(360,3974) ; D7.3@426,3880 D7.4@516,3880 518,3878 U14.5@792,3878 ; v1(427,3836) D7.3@427,3880
  Bottom Layer w10: v1(360,3974) v1(360,3918) 360,3903 v1(427,3836)
USB_DP: D7.1 D7.6 J8.A6 J8.B6 U14.4 | length 655.7
  Top Layer w10: J8.B6@300,3907 332,3907 350,3889 387,3889 387,3947 ; J8.A6@300,3947 D7.1@414,3947 ; D7.1@426,3954 D7.6@516,3954 560,3954 616,3898 U14.4@792,3898
UVLO_N: R1.2 R2.1 U1.3 | length 381.1
  Top Layer w8: v1(792,2692) 796,2692 820,2668 U1.3@818,2642 ; R1.2@800,2470 848,2520 ; v1(848,2580) 848,2520 ; R2.1@896,2507 880,2520 848,2520
  Bottom Layer w8: v1(792,2692) 848,2636 v1(848,2580)
V3V3: C13.1 C20.1 C21.1 C22.1 C24.1 C42.1 C43.1 C44.1 C45.1 C46.1 C54.1 C55.1 C56.1 C57.1 FB1.1 J3.2 L2.2 R12.1 R14.1 R15.1 R17.1 R18.1 R19.1 R20.1 R21.1 R22.1 R23.1 R25.1 R51.1 R52.1 R56.1 TP7.1 U6.2 U7.8 U12.15 U12.19 U12.20 U12.25 U12.28 U14.6 U14.7 | length 2772.8
  Top Layer w12: v1(620,3762) 692,3834 774,3834 U14.7@792,3839 ; v1(695,3933) C57.1@728,3932 ; U14.6@792,3859 774,3854 774,3794 v1(858,3710) ; v1(1664,4048) 1688,4048 1724,4084 R14.1@1742,4092 ; v1@1728,4356 1744,4372 C22.1@1745,4390 ; v1(2690,3400) 2690,3418 U7.8@2719,3429 ; v1(3870,356) 3870,372 U12.28@3909,384 ; v1(3870,1062) 3870,1046 U12.15@3909,1034 ; U12.25@3909,534 3948,534 v1(3964,550) ; U12.20@3909,784 3948,784 v1(3966,784) ; U12.19@3909,834 3948,846 v1(3992,802)
  Top Layer w20: v1(648,3804) 666,3822 C56.1@672,3839 ; v1(704,3852) 720,3836 C55.1@728,3821 ; C54.1@797,3743 814,3728 v1(832,3728) ; v1(942,3704) 942,3722 R56.1@957,3740 ; v1(1544,2168) 1562,2168 L2.2@1634,2191 ; v1(1564,2320) 1564,2302 C13.1@1582,2274 ; v1(1592,1844) 1592,1862 R12.1@1607,1880 ; v1(1638,4340) 1776,4340 1792,4356 U6.2@1821,4361 ; C20.1@1683,4328 1710,4336 v1(1728,4354) ; C21.1@1752,4323 1766,4338 1766,4356 ; v1(1972,3092) 1990,3092 R22.1@2005,3110 ; R15.1@1998,3452 2016,3436 v1(2030,3422) ; v1(2032,2668) 2048,2684 TP7.1@2067,2697 ; v1(2232,3094) 2232,3112 R23.1@2247,3130 ; R18.1@2608,3969 2626,3972 v1(2644,3972) ; v1(2630,3400) 2630,3418 C24.1@2648,3433 ; v1(2654,4298) 2654,4280 R25.1@2670,4262 ; R17.1@2778,3317 2794,3300 v1(2810,3300) ; v1(2858,3702) 2876,3702 R19.1@2891,3720 ; R20.1@2936,3907 2952,3890 v1(2968,3890) ; v1(3172,3794) 3172,3778 R21.1@3189,3762 ; v1(3794,848) 3812,848 C42.1@3829,864 ; C46.1@3829,514 3846,518 v1(3964,518) ; C43.1@3829,800 3830,816 v1(3830,832) ; v1(3902,1068) 3902,1084 C44.1@3907,1100 ; C45.1@3910,315 3926,298 v1(3942,298) ; v1(4168,218) 4184,218 R52.1@4200,236 ; v1(4424,228) 4440,228 R51.1@4456,246 ; v1(4564,1574) 4564,1592 FB1.1@4583,1614
  Bottom Layer w12: v1@1636,4340 1608,4312 1608,4104 v1(1664,4048)
  other v1: 1494,4348
V3V3_REF: C18.1 C19.1 C29.1 C30.1 D12.2 D13.2 D14.2 D15.2 D16.2 D17.2 D18.2 D19.2 TP9.1 U5.2 U9.15 U9.16 | length 4264.1
  Top Layer w12: TP9.1@4104,3140 4124,3148 C18.1@4272,3296 ; TP9.1@4108,3140 4308,2940 4308,2888 4288,2868 C30.1@4272,2852 U9.15@4272,2812 ; C29.1@4166,2785 4180,2784 U9.16@4224,2784 ; U9.16@4225,2783 4236,2812 U9.15@4272,2812 ; C18.1@4274,3297 U5.2@4316,3296 ; U9.15@4275,2783 U9.15@4272,2812 ; C19.1@4331,3241 4316,3256 U5.2@4316,3296 ; C19.1@4332,3240 v1(4628,3240) ; U5.2@4333,3300 U5.2@4316,3296 ; v1(4796,3276) v1(5192,3276) 5324,3408 5324,3492 5328,3496 D15.2@5347,3506 ; v1(5264,3268) 5328,3268 D14.2@5347,3260 ; v1(5284,3056) 5328,3056 D13.2@5347,3063 ; D16.2@5347,1695 5356,1704 v1(5376,1724) ; D17.2@5347,1892 5364,1904 5384,1924 5384,1984 5352,2016 D18.2@5352,2088 ; D18.2@5347,2089 5364,2092 v1(5384,2092) ; D19.2@5347,2384 5348,2396 v1(5408,2456) ; D12.2@5347,2916 5348,2928 v1(5400,2980) ; D17.2@5348,1892 v1(5376,1864)
  Bottom Layer w12: v1(4628,3240) 4760,3240 v1(4796,3276) ; v1(5192,3276) 5256,3276 v1(5264,3268) 5264,3076 v1(5284,3056) 5360,2980 v1(5400,2980) 5408,2972 v1(5408,2456) 5408,2116 v1(5384,2092) ; v1(5376,1724) v1(5376,1864)
V3V3_RF: C15.1 C16.1 C51.1 C52.1 C53.1 TP8.1 U4.5 U13.3 | length 3738
  Top Layer w12: U4.5@2413,2202 2416,2212 C15.1@2414,2264 ; 2416,2216 2464,2216 C16.1@2480,2202 ; C16.1@2480,2204 2540,2264 2668,2264 TP8.1@2677,2244 ; TP8.1@2676,2248 2824,2396 3172,2396 v1(3756,2980) ; C52.1@4931,4323 4956,4304 C53.1@5000,4304 ; v1(4964,4192) 4980,4208 U13.3@5000,4242 ; U13.3@5000,4244 C53.1@5000,4304 ; C53.1@5007,4321 C53.1@5000,4304 ; C51.1@5007,4380 5008,4364 C53.1@5008,4320
  Bottom Layer w12: v1(3756,2980) 4268,3492 4268,3496 v1(4964,4192)
V5V0: C9.1 C10.1 C11.1 C12.1 C14.1 C17.1 C25.1 C31.1 C32.1 C58.1 D8.2 D9.2 K1.1 K2.1 L1.2 R10.1 R67.1 R72.1 TP6.1 U3.1 U3.4 U4.1 U4.3 U5.1 U8.8 U10.4 U11.4 U15.4 U16.4 | length 12645.2
  Top Layer w15: C32.1@4852,3172 4888,3172 4892,3168 4896,3168 U10.4@4925,3169 ; U10.4@4924,3168 4960,3168 5048,3080 5048,2752 5020,2724 5020,2488 5100,2408 5100,2140 5140,2100 5140,1956 5064,1880 5048,1880 5040,1872 5040,1864 U11.4@5039,1835
  Top Layer w20: K2.1@1382,905 1404,880 1540,744 1540,628 D9.2@1808,360 ; K1.1@1382,1693 1408,1720 1488,1800 1488,1976 U3.4@1516,2004 ; 1440,2128 1712,2128 1728,2112 1728,2024 1680,1976 1680,1960 ; C11.1@1464,2056 U3.4@1516,2004 ; C11.1@1464,2057 1448,2084 1440,2092 1440,2296 L1.2@1644,2502 ; U3.4@1534,2015 U3.4@1516,2004 ; R72.1@1575,244 1592,228 1676,228 D9.2@1820,372 ; R10.1@1612,3061 1624,3076 v1(1640,3092) ; U3.1@1636,1941 1656,1936 1680,1960 ; L1.2@1640,2500 v1(1640,2620) ; C12.1@1703,1941 1688,1952 1680,1960 ; C12.1@1704,1940 1748,1940 C9.1@1764,1939 ; 1728,2084 C10.1@2288,2084 ; D9.2@1821,370 1844,384 1952,492 1952,516 U16.4@2000,564 ; U16.4@1999,563 2028,584 2372,928 2372,1044 U15.4@2424,1096 ; U4.3@2311,2128 U4.3@2320,2116 ; U4.1@2311,2202 2332,2208 2356,2184 2356,2148 2324,2116 U4.3@2320,2116 ; C10.1@2312,2064 2344,2032 2352,2032 2456,1928 2456,1800 R67.1@2441,1784 ; U4.1@2312,2200 2284,2228 2284,2708 2296,2720 TP6.1@2313,2736 ; TP6.1@2312,2736 2636,3060 2636,3312 2692,3368 2732,3368 2800,3436 ; C10.1@2313,2065 C10.1@2288,2084 ; U15.4@2422,1095 2452,1136 2484,1136 ; R67.1@2440,1784 2528,1696 D8.2@2530,1679 ; C58.1@2512,1093 2496,1120 2484,1132 2484,1576 2528,1620 D8.2@2528,1680 ; C25.1@2776,4146 2792,4132 2816,4108 2816,4056 2800,4040 2800,3436 ; C25.1@2776,4148 2776,4196 U8.8@2778,4206 ; C14.1@4274,3376 4260,3392 4236,3416 4184,3416 4164,3396 3228,3396 3192,3360 2876,3360 2800,3436 ; C14.1@4276,3376 U5.1@4316,3376 ; C17.1@4331,3433 4316,3420 U5.1@4316,3376 ; U5.1@4332,3372 4652,3372 4836,3188 C32.1@4852,3172 ; U5.1@4333,3374 U5.1@4316,3376 ; C31.1@5042,1762 5056,1744 5088,1744 5144,1800 5144,1876 5104,1916 ; C10.1@2288,2084 U4.3@2320,2116
  Bottom Layer w20: v1(1640,2620) v1(1640,3092)
VBAT: D2.1 J2.1 TP2.1 | length 651.2
  Top Layer w20: J2.1@228,2065 276,2104 568,2104 ; TP2.1@591,1939 568,1944 568,2104 ; D2.1@648,2185 568,2104
VBAT_RTC: BT1.1 U8.3 | length 1495.1
  Top Layer w10: U8.3@2990,4306 3020,4316 3352,4316 v1(3416,4252) 3484,4320 BT1.1@3583,4350 ; v1(3464,3568) 3540,3568 BT1.1@3583,3524
  Bottom Layer w10: v1(3416,4252) 3464,4204 v1(3464,3568)
VBUS_SENSE: R57.2 R58.1 U14.8 | length 378.4
  Top Layer w8: R57.2@652,4035 656,4038 740,4038 R58.1@758,4053 ; R58.1@776,4038 802,4012 v1(802,3982) ; v1(802,3814) 822,3814 U14.8@827,3804
  Bottom Layer w8: v1(802,3814) v1(802,3982)
VBUS_USB: D7.5 J8.A4B9 J8.B4A9 R57.1 | length 707.3
  Top Layer w20: J8.B4A9@300,3843 322,3844 v1(340,3844) ; J8.A4B9@300,4031 326,4030 v1(342,4046) ; D7.5@516,3917 538,3922 v1(556,3922) ; v1(542,3988) 574,4020 R57.1@588,4035
  Bottom Layer w20: 328,4006 472,4006 v1(556,3922) ; v1(340,3844) 328,3856 328,4032 v1(342,4046) ; 516,3962 v1(542,3988)
VCAP: C41.1 U12.1 | length 81.2
  Top Layer w8: U12.1@4279,384 4316,380 C41.1@4360,381
VIN24: D1.1 J1.1 TP1.1 | length 647.6
  Top Layer w20: J1.1@228,2656 276,2608 560,2608 ; TP1.1@581,2766 560,2756 560,2608 ; D1.1@648,2520 560,2608
VIN_F: C2.1 C3.1 D3.2 F1.2 R1.1 U1.1 U1.2 | length 616.3
  Top Layer w20: F1.2@603,2382 624,2356 736,2468 756,2448 756,2428 764,2420 D3.2@807,2379 ; C3.1@711,2638 724,2624 U1.1@768,2624 ; R1.1@736,2470 744,2488 780,2524 780,2548 C2.1@800,2568 ; U1.1@766,2642 772,2616 U1.2@784,2616 ; U1.2@792,2642 U1.2@784,2616 ; C2.1@800,2569 800,2592 784,2608 U1.2@784,2616
VIN_OR: D1.2 D2.2 F1.1 | length 333.7
  Top Layer w20: D2.2@494,2185 500,2216 F1.1@500,2380 ; D1.2@494,2520 496,2420 F1.1@499,2382
VIN_PROT: C4.1 C5.1 C6.1 R5.2 R6.1 TP3.1 U1.15 U1.16 U2.7 | length 2318.5
  Top Layer w20: U1.16@760,2844 U1.16@766,2870 ; U1.15@792,2870 784,2864 764,2844 732,2844 664,2912 664,2944 824,3104 864,3104 R5.2@940,3180 ; R5.2@928,3179 944,3180 TP3.1@1072,3180 ; TP3.1@1073,3179 1088,3164 1236,3016 1260,3016 1264,3020 v1@1340,3020 ; C5.1@1329,2964 1356,2942 C6.1@1356,2912 ; C5.1@1342,2954 v1(1342,3026) ; C6.1@1371,2894 1386,2886 1418,2886 U2.7@1449,2898 ; C6.1@1376,2892 1376,2768 1396,2748 1472,2748 1564,2656 1812,2656 1972,2816 R6.1@1988,2832 ; v1(1408,3092) 1408,3074 C4.1@1457,3052
  Bottom Layer w20: v1(1342,3026) v1(1408,3092)
X1_N: U8.1 Y1.1 | length 186.6
  Top Layer w8: U8.1@2990,4206 3132,4208 3148,4224 Y1.1@3148,4246
X2_N: U8.2 Y1.4 | length 125.6
  Top Layer w8: U8.2@2990,4256 3100,4256 Y1.4@3112,4246
pads on no net: D6.5 J6.0 J6.7 J8.0 J8.A8 J8.B8 MH1.0 MH2.0 MH3.0 MH4.0 U1.4 U1.6 U1.7 U1.10 U1.13 U4.4 U6.14 U6.17 U6.18 U6.19 U6.20 U6.21 U6.22 U6.23 U6.24 U6.32 U12.3 U12.5 U13.7 U13.8 U13.10 U13.11 U14.1 U14.2 U14.10 U14.11 U14.12 U14.13 U14.14 U14.15 U14.16 U14.17 U14.18 U14.19 U14.20 U14.21 U14.22 U14.23 U14.27 Y1.2 Y1.3

## Polygon pours and split planes (outlines as drawn)
GND on L2_GND (split plane): 6278.9,20.1 20.1,20.1 20.1,4703.9 6278.9,4703.9
V3V3 on L3_PWR (split plane): 6278.9,20.1 20.1,20.1 20.1,4703.9 6278.9,4703.9

## Other copper
Top Layer:
  rectangle net GND: 2033,4033 2179,4180

## Silkscreen, mask and mechanical layers (free items; w line width, h text height)
Top Overlay:
  text "GND" at 5626,3743 h50
  text "AIN3" at 5596,3543 h50
  text "AIN2" at 5596,3343 h50
  text "AIN1" at 5596,3143 h50
  text "AIN0" at 5596,2943 h50
  text "24V" at 469,2831 h50
  text "SDA" at 2656,2723 h50
  text "VERIFICAR ORDEN" at 2985,2650 h45 r90
  text "ANTES DE ENCHUFAR" at 3062,2650 h45 r90
  text "GND" at 469,2631 h50
  text "SCL" at 2638,2623 h50
  text "3V3" at 2638,2523 h50
  text "GND" at 5626,2522 h50
  text "GND" at 2638,2445 h50
  text "AIN7" at 5596,2322 h50
  text "BAT+" at 469,2240 h50
  text "AIN6" at 5596,2122 h50
  text "GND" at 469,2040 h50
  text "AIN5" at 5596,1922 h50
  text "AIN4" at 5596,1722 h50
  text "K1 COM" at 469,1632 h50
  text "K1 NO" at 469,1432 h50
  text "K1 NC" at 469,1232 h50
  text "K2 COM" at 469,962 h50
  text "K2 NO" at 469,762 h50
  text "K2 NC" at 469,562 h50